# EAGLE board PortableUnityOneWithOutAntirimbalzoV201 (EAGLE 7.4.0)
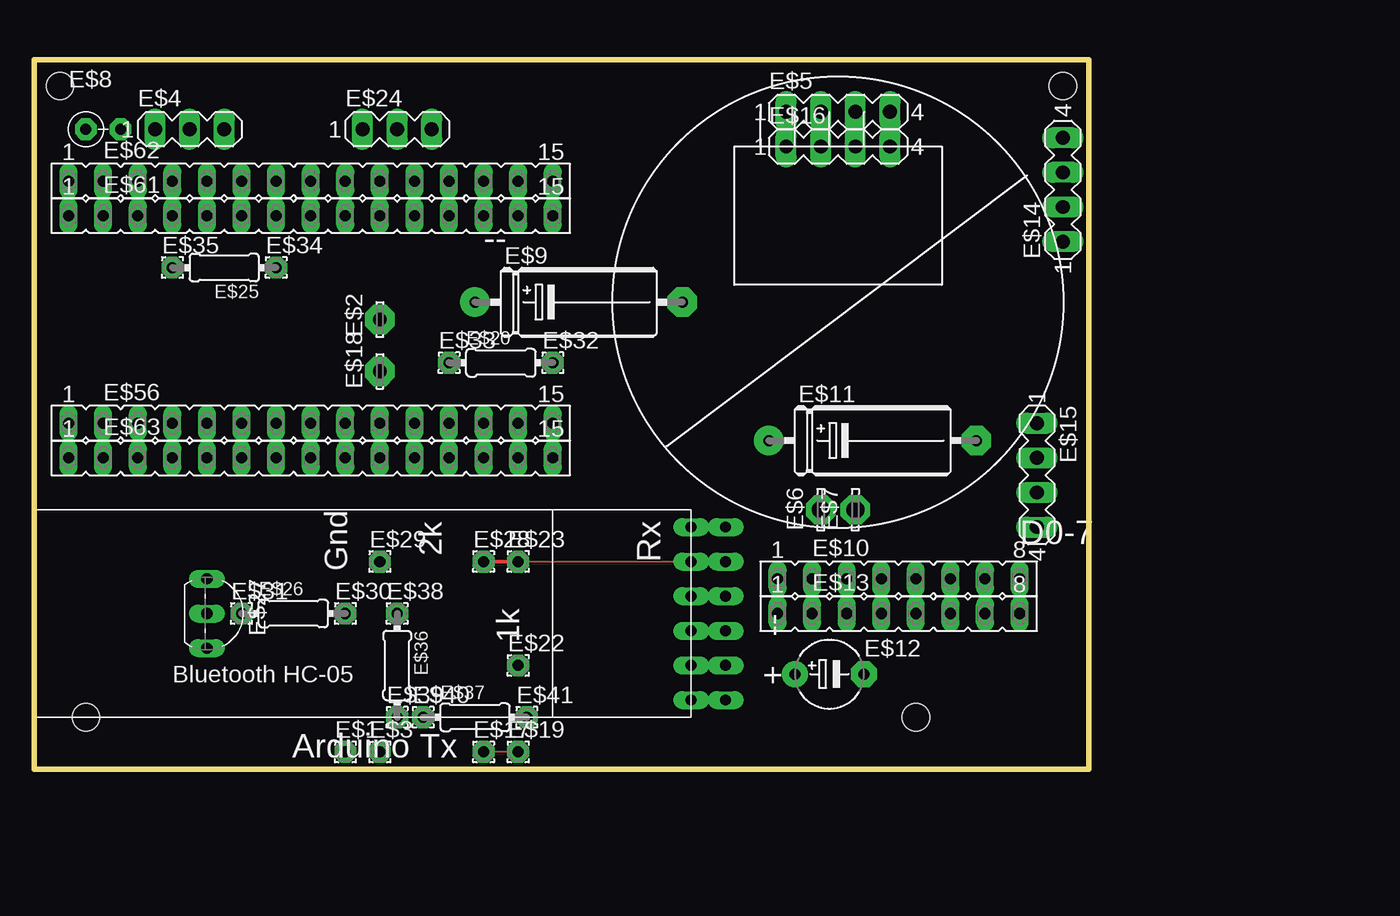
[diagram p0: board, top side]
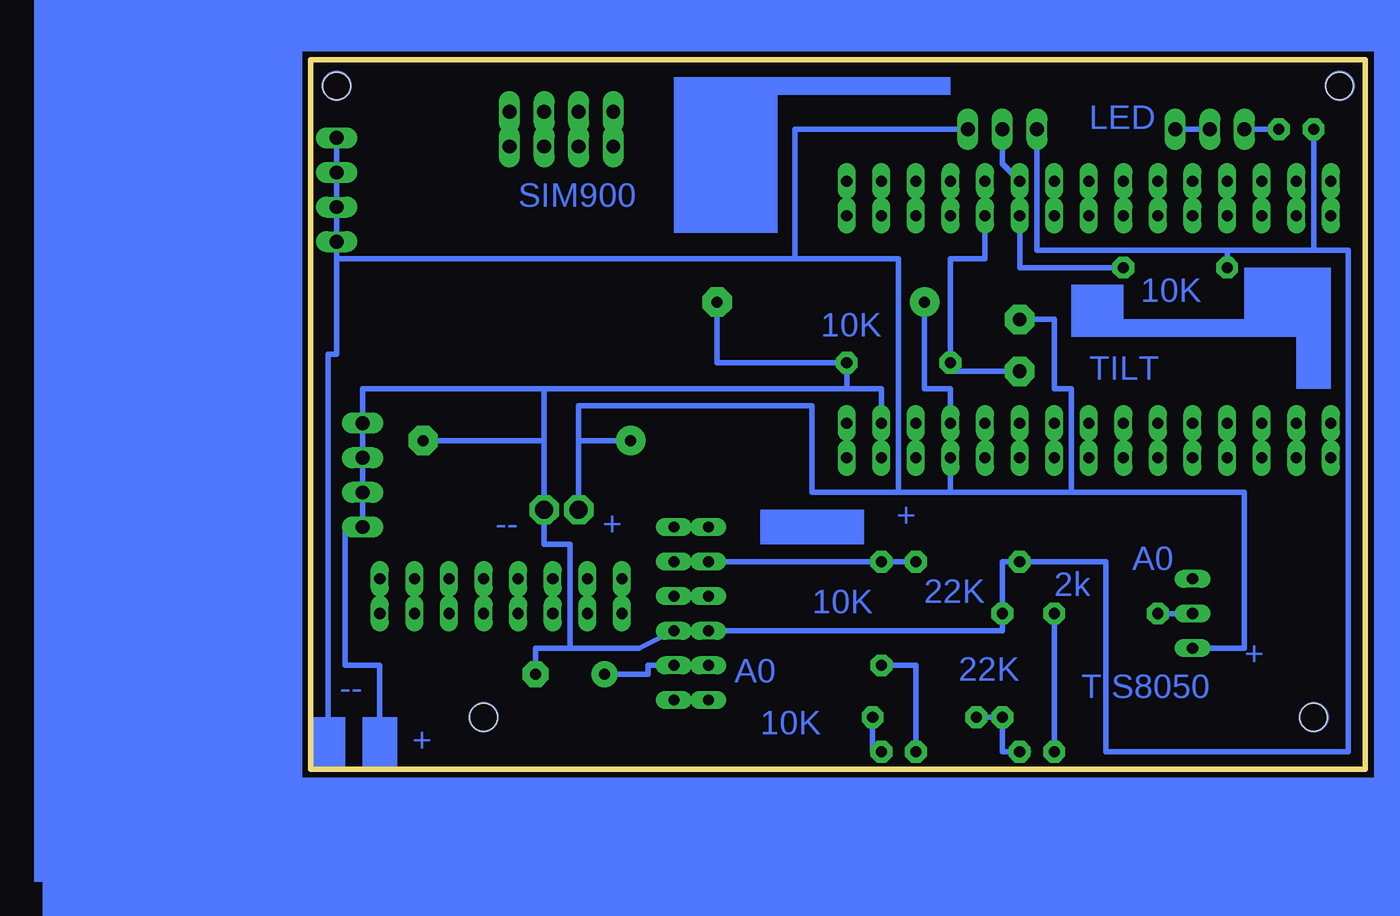
[diagram p1: board, bottom side, seen from below]

Size 77.47 x 52.07 mm. Coordinates in mm from the lower left corner, seen from the top.
Outline: 0,0 0,52.07 77.47,52.07 77.47,0 0,0
Copper layers (1*16): Top 0.035mm / dielectric 1.5mm / Bottom 0.035mm
Design rules "default": minimum track width 10mil, minimum drill 24mil, track to track 8mil, track to pad 8mil, pad to pad 8mil, via to via 8mil, smd to smd 8mil, copper to edge 40mil, drill to drill 8mil, minimum pad ring 10mil, minimum via ring 8mil, stop-mask expansion 4mil, vias tented up to drill 0mil, thermal gap 10mil
Holes 2 mm at 1.91,50.16 75.56,50.16 3.81,3.81 64.77,3.81

## Footprints (pad centres in the part's own frame; a part is rotated, then mirrored left to right if it is on the bottom)
1,6/0,8 = drill 0.813 pad 1.6 octagon: 1 0,0
LSP10 = drill 1.016 pad 2.159 octagon: MP 0,0
MA03-1 = drill 1.016 long: 1 -2.54,0; 2 0,0; 3 2.54,0
MA04-1 = drill 1.016 long: 1 -3.81,0; 2 -1.27,0; 3 1.27,0; 4 3.81,0
LSP13 = drill 1.321 pad 2.159 octagon: MP 0,0
RS-2,5 = drill 0.813 pad 1.6 octagon: 1 -1.27,0; 2 1.27,0
E15-5 = drill 0.813 pad 2.159: + -7.62,0 | drill 0.813 pad 2.159 octagon: - 7.62,0
FE08 = drill 0.813 long: 1 -8.89,0; 2 -6.35,0; 3 -3.81,0; 4 -1.27,0; 5 1.27,0; 6 3.81,0; 7 6.35,0; 8 8.89,0
E5-5 = drill 0.813 pad 1.905: + -2.54,0 | drill 0.813 pad 1.905 octagon: - 2.54,0
0204/7 = drill 0.813 octagon: 1 -3.81,0; 2 3.81,0
HC-05 = drill 0.8 long: P$1 -6.35,25.4; P$2 -3.81,25.4; P$3 -1.27,25.4; P$4 1.27,25.4; P$5 3.81,25.4; P$6 6.35,25.4; P$7 6.35,22.86; P$8 3.81,22.86; P$9 1.27,22.86; P$10 -1.27,22.86; P$11 -3.81,22.86; P$12 -6.35,22.86 | drill 0.8 octagon: P$13 3.81,10.16; P$14 -3.81,10.16; P$15 -3.81,7.62; P$16 -3.81,0; P$17 10.16,10.16; P$18 10.16,7.62
TO92- = drill 0.813 long: 1 2.54,0; 2 0,0; 3 -2.54,0
FE15 = drill 0.813 long: 1 -17.78,0; 2 -15.24,0; 3 -12.7,0; 4 -10.16,0; 5 -7.62,0; 6 -5.08,0; 7 -2.54,0; 8 0,0; 9 2.54,0; 10 5.08,0; 11 7.62,0; 12 10.16,0; 13 12.7,0; 14 15.24,0; 15 17.78,0

## Placement (x,y rotation side)
E$1  [1,6/0,8]  22.86,1.27 0 top
E$2  [LSP10]  25.4,33.02 90 top
E$3  [1,6/0,8]  25.4,1.27 0 top
E$4  [MA03-1]  11.43,46.99 0 top
E$5  [MA04-1]  59.05,48.26 0 top
E$6  [LSP13]  57.78,19.05 90 top
E$7  [LSP13]  60.33,19.05 90 top
E$8  [RS-2,5]  5.08,46.99 0 top
E$9  [E15-5]  40.01,34.29 0 top
E$10  [FE08]  63.5,13.97 0 top
E$11  [E15-5]  61.59,24.13 0 top
E$12  [E5-5]  58.42,6.99 0 top
E$13  [FE08]  63.5,11.43 0 top
E$14  [MA04-1]  75.56,42.55 90 top
E$15  [MA04-1]  73.66,21.59 270 top
E$16  [MA04-1]  59.05,45.72 0 top
E$17  [1,6/0,8]  33.02,1.27 0 top
E$18  [LSP10]  25.4,29.21 90 top
E$19  [1,6/0,8]  35.56,1.27 0 top
E$20  [0204/7]  34.29,29.84 0 top
E$21  [HC-05]  25.4,11.43 270 top
E$22  [1,6/0,8]  35.56,7.62 0 top
E$23  [1,6/0,8]  35.56,15.24 0 top
E$24  [MA03-1]  26.67,46.99 0 top
E$25  [0204/7]  13.97,36.83 180 top
E$26  [0204/7]  19.05,11.43 0 top
E$27  [TO92-]  12.7,11.43 270 top
E$28  [1,6/0,8]  33.02,15.24 0 top
E$29  [1,6/0,8]  25.4,15.24 0 top
E$30  [1,6/0,8]  22.86,11.43 0 top
E$31  [1,6/0,8]  15.24,11.43 0 top
E$32  [1,6/0,8]  38.1,29.84 0 top
E$33  [1,6/0,8]  30.48,29.84 0 top
E$34  [1,6/0,8]  17.78,36.83 0 top
E$35  [1,6/0,8]  10.16,36.83 0 top
E$36  [0204/7]  26.67,7.62 270 top
E$37  [0204/7]  32.38,3.81 0 top
E$38  [1,6/0,8]  26.67,11.43 0 top
E$39  [1,6/0,8]  26.67,3.81 0 top
E$40  [1,6/0,8]  28.57,3.81 0 top
E$41  [1,6/0,8]  36.2,3.81 0 top
E$56  [FE15]  20.32,25.4 0 top
E$61  [FE15]  20.32,40.64 0 top
E$62  [FE15]  20.32,43.18 0 top
E$63  [FE15]  20.32,22.86 0 top

## Library data of the parts
E$1 E$3 E$17 E$19 E$22 E$23 E$28-E$35 E$38-E$41 = wirepad
E$2 E$6 E$7 E$18 = solpad
E$4 E$5 E$14-E$16 E$24 = con-lstb
E$8 = discrete
E$9 E$11 = resistor
E$10 E$13 E$56 E$61-E$63 = con-lsta
E$12 = rcl
E$20 E$25 E$26 E$36 E$37 = eagle-ltspice
E$21 = LSGPackages
E$27 = transistor-fet

## Nets
S$2: E$56.6 E$63.6
S$3: E$21.P$17 E$37.2
S$4: E$10.1 E$13.1
S$5: E$61.14 E$62.14
S$7: E$4.1 E$8.2
S$8: E$61.15 E$62.15
S$9: E$4.2 E$4.3
S$10: E$26.1 E$27.2
S$11: E$61.12 E$62.12
S$12: E$10.2 E$13.2
S$13: E$10.3 E$13.3
S$14: E$10.4 E$13.4
S$15: E$10.5 E$13.5
S$16: E$10.6 E$13.6
S$17: E$10.7 E$13.7
S$18: E$10.8 E$13.8
S$19: E$2.MP E$9.+ E$11.+ E$14.1 E$14.4 E$24.3 E$56.12 E$63.12
S$20: E$1.1 E$26.2
S$21: E$21.P$11 E$21.P$15
S$22: E$21.P$1 E$21.P$12
S$23: E$12.+ E$21.P$5
S$24: E$9.- E$11.- E$12.- E$15.1 E$15.2 E$15.4 E$20.2 E$21.P$4 E$56.14 E$63.14
S$26: E$3.1 E$36.2 E$37.1
S$29: E$5.1 E$16.1
S$30: E$5.2 E$16.2
S$31: E$5.3 E$16.3
S$32: E$61.2 E$62.2
S$33: E$5.4 E$16.4
S$34: E$24.2 E$25.1 E$61.10 E$62.10
S$35: E$18.MP E$20.1 E$61.11 E$62.11
S$36: E$21.P$13 E$21.P$18
S$40: E$56.15 E$63.15
S$41: E$56.1 E$63.1
S$42: E$56.2 E$63.2
S$43: E$21.P$16 E$24.1 E$25.2
S$56: E$56.3 E$63.3
S$57: E$56.4 E$63.4
S$71: E$56.5 E$63.5
S$73: E$56.7 E$63.7
S$89: E$56.8 E$63.8
S$90: E$61.1 E$62.1
S$105: E$56.9 E$63.9
S$106: E$56.10 E$63.10
S$107: E$56.11 E$63.11
S$109: E$56.13 E$63.13
S$114: E$61.3 E$62.3
S$115: E$61.4 E$62.4
S$116: E$61.5 E$62.5
S$117: E$61.6 E$62.6
S$118: E$61.7 E$62.7
S$119: E$61.8 E$62.8
S$120: E$61.9 E$62.9
S$124: E$61.13 E$62.13

## Tracks (layer width: path | path; a pad name or v marks a point on that pad's centre or on a via)
S$2
  Bottom 0.406: E$56.6 E$63.6
S$3
  Bottom 0.406: E$37.2 36.2,1.27 E$21.P$17
S$4
  Bottom 0.406: E$10.1 E$13.1
S$5
  Bottom 0.406: E$61.14 E$62.14
S$7
  Bottom 0.406: E$8.2 E$4.1
S$8
  Bottom 0.406: E$62.15 E$61.15
S$9
  Bottom 0.406: E$4.3 E$4.2
S$10
  Bottom 0.406: E$27.2 E$26.1
S$11
  Bottom 0.406: E$61.12 E$62.12
S$12
  Bottom 0.406: E$10.2 E$13.2
S$13
  Bottom 0.406: E$10.3 E$13.3
S$14
  Bottom 0.406: E$10.4 E$13.4
S$15
  Bottom 0.406: E$10.5 E$13.5
S$16
  Bottom 0.406: E$10.6 E$13.6
S$17
  Bottom 0.406: E$10.7 E$13.7
S$18
  Bottom 0.406: E$10.8 E$13.8
S$19
  Bottom 0.406: 76.2,3.81 76.2,30.48 75.56,30.48 E$14.1 E$14.4 75.56,37.47 41.91,37.47 | E$24.3 41.91,46.99 41.91,37.47 | 41.91,37.47 34.29,37.47 34.29,20.32 | 34.29,20.32 40.64,20.32 40.64,26.67 57.78,26.67 57.78,24.13 | 12.7,8.89 8.89,8.89 8.89,20.32 21.59,20.32 | 21.59,20.32 30.48,20.32 | 30.48,20.32 34.29,20.32 | E$2.MP 22.86,33.02 22.86,27.94 21.59,27.94 21.59,20.32 | 30.48,20.32 E$63.12 E$56.12 30.48,27.94 32.38,27.94 E$9.+ | 57.78,19.05 57.78,24.13 | E$11.+ 57.78,24.13
S$20
  Bottom 0.406: E$26.2 E$1.1
S$21
  Bottom 0.406: E$21.P$15 E$21.P$11
S$22
  Bottom 0.406: E$21.P$12 E$21.P$1
S$23
  Bottom 0.406: E$21.P$5 52.7,7.62 52.7,6.99 E$12.+
S$24
  Bottom 0.406: E$12.- 60.96,8.89 58.42,8.89 | 72.39,3.81 72.39,7.62 74.93,7.62 74.93,17.78 E$15.4 E$15.2 E$15.1 73.66,27.94 60.33,27.94 | E$63.14 E$56.14 35.56,27.94 38.1,27.94 | 60.33,27.94 38.1,27.94 | 38.1,27.94 E$20.2 47.62,29.84 E$9.- | 60.33,27.94 60.33,24.13 | 60.33,24.13 60.33,16.51 58.42,16.51 58.42,8.89 | 58.42,8.89 53.34,8.89 E$21.P$4 | 60.33,24.13 E$11.-
S$26
  Bottom 0.406: E$37.1 E$36.2 26.67,1.27 E$3.1 24.77,1.27
S$29
  Bottom 0.406: E$5.1 E$16.1
S$30
  Bottom 0.406: E$5.2 E$16.2
S$31
  Bottom 0.406: E$5.3 E$16.3
S$32
  Bottom 0.406: E$62.2 E$61.2
S$33
  Bottom 0.406: E$5.4 E$16.4
S$34
  Bottom 0.406: E$24.2 26.67,44.45 E$62.10 | E$25.1 25.4,36.83 E$62.10 | E$61.10 E$62.10
S$35
  Bottom 0.406: E$62.11 E$61.11 27.94,37.47 30.48,37.47 E$20.1 30.48,29.21 E$18.MP
S$36
  Bottom 0.406: E$21.P$18 33.02,7.62 E$21.P$13
S$40
  Bottom 0.406: E$63.15 E$56.15
S$41
  Bottom 0.406: E$63.1 E$56.1
S$42
  Bottom 0.406: E$63.2 E$56.2
S$43
  Bottom 0.406: E$24.1 24.13,38.1 10.16,38.1 | 3.81,38.1 1.27,38.1 1.27,1.27 19.05,1.27 19.05,15.24 E$21.P$16 26.67,15.24 26.67,10.16 49.53,10.16 | 3.81,38.1 3.81,46.99 | 10.16,38.1 3.81,38.1 | E$25.2 10.16,38.1
S$56
  Bottom 0.406: E$63.3 E$56.3
S$57
  Bottom 0.406: E$63.4 E$56.4
S$71
  Bottom 0.406: E$63.5 E$56.5
S$73
  Bottom 0.406: E$63.7 E$56.7
S$89
  Bottom 0.406: E$63.8 E$56.8
S$90
  Bottom 0.406: E$62.1 E$61.1
S$105
  Bottom 0.406: E$63.9 E$56.9
S$106
  Bottom 0.406: E$63.10 E$56.10
S$107
  Bottom 0.406: E$63.11 E$56.11
S$109
  Bottom 0.406: E$63.13 E$56.13
S$114
  Bottom 0.406: E$62.3 E$61.3
S$115
  Bottom 0.406: E$62.4 E$61.4
S$116
  Bottom 0.406: E$62.5 E$61.5
S$117
  Bottom 0.406: E$61.6 E$62.6
S$118
  Bottom 0.406: E$61.7 E$62.7
S$119
  Bottom 0.406: E$61.8 E$62.8
S$120
  Bottom 0.406: E$61.9 E$62.9
S$124
  Bottom 0.406: E$61.13 E$62.13
(copper drawn outside any net)
  shapes: Bottom area x14, Bottom circle x4

## Text on the board
Bottom: LED | SIM900 | 10K | 10K | TILT | + | + | -- | A0 | 22K | 2k | 10K | + | 22K | T S8050 | A0 | -- | 10K | +
tPlace: - | -- | D0-7